# Altium PCB MD045B_PCB.PcbDoc (part 3 of 3)
Units mm, origin at the board's own origin, x right, y up, seen from the top; angles counter-clockwise.
Board outline 82.8 x 63.09 mm, 4 copper layers (Top Layer, Ground, Power, Bottom Layer), stack 1.707 mm thick; 146 components, 68 nets, 333 pads, 309 vias.
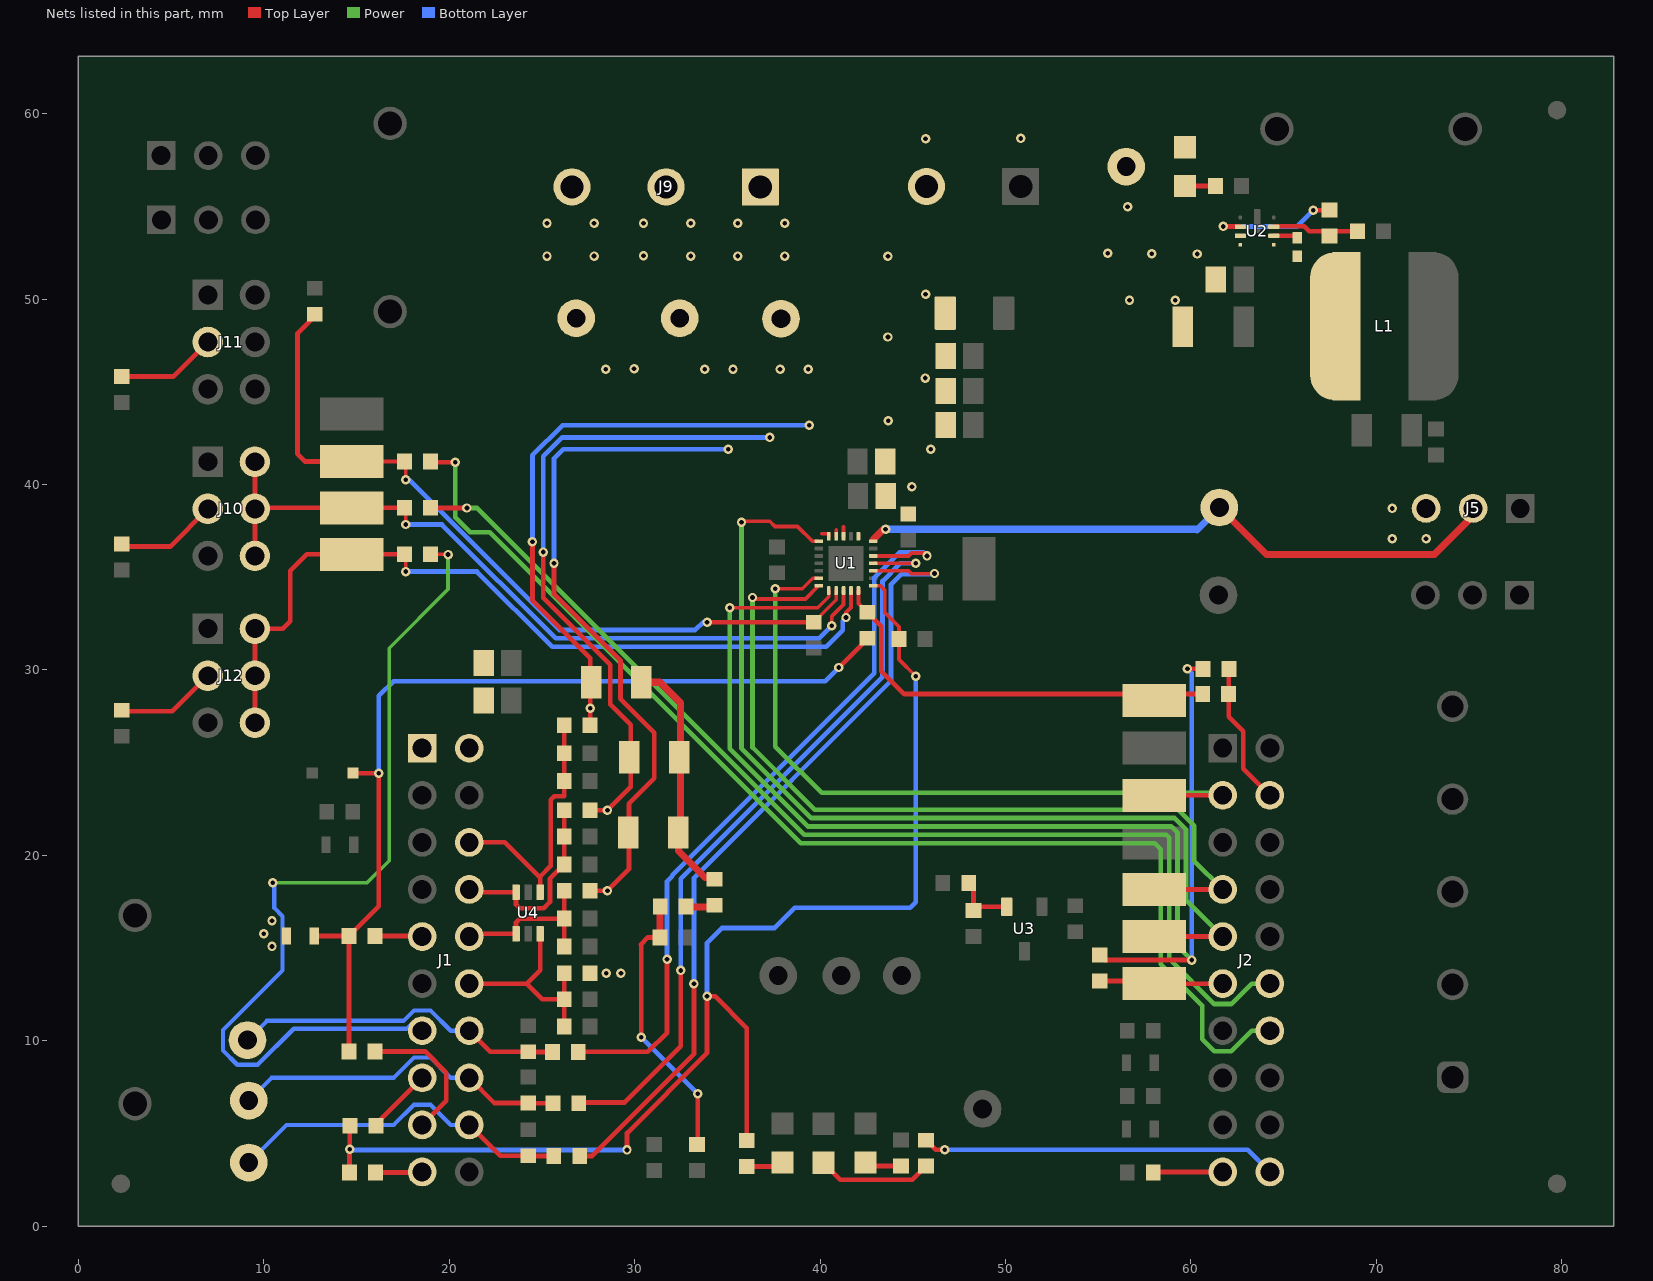
[diagram p4: the nets of this part, all layers, seen from the top]

## Via types
v1: diameter 0.508, hole 0.254, Top Layer to Bottom Layer, tented both sides, 303 vias
v2: diameter 0.5, hole 0.2, Top Layer to Bottom Layer, 5 vias
v3: diameter 0.508, hole 0.254, Top Layer to Bottom Layer, tented bottom, 1 vias

## Nets (pads, with @x,y where several pads share a name; then routed paths per layer and width w, separated by ;. In a path a pad name is that pad's centre, name@x,y a point inside that pad or via, vN(x,y) a via of type N, cw(c..) or ccw(c..) an arc to the next point about the centre after c; other vN are vias at no path point) (continued)
INHC: J2.9 TP14.1 U1.13 | length 52.9
  Top Layer w0.2: v1(35.763,37.973) 35.809,38.019 37.292,38.019 37.57,37.741 38.792,37.741 39.583,36.95 U1.13@39.937,36.95
  Top Layer w0.254: TP14.1@58.025,15.621 J2.9@61.722,15.621
  Power w0.254: v1(35.763,37.973) 35.763,25.773 39.522,22.014 59.125,22.014 59.74,21.398 59.74,17.603 J2.9@61.722,15.621
INLA: J2.3 TP13.1 U1.18 | length 40
  Top Layer w0.2: v1(37.592,34.385) 39.042,34.385 39.607,34.95 U1.18@39.937,34.95
  Top Layer w0.254: TP13.1@58.025,23.241 J2.3@61.722,23.241
  Power w0.254: v1(37.592,34.385) 37.592,25.871 40.087,23.376 61.587,23.376 J2.3@61.722,23.241
INLB/PWM_SYN: J2.7 TP7.1 U1.19 | length 45.3
  Top Layer w0.2: v1(36.36,33.909) 36.438,33.831 39.218,33.831 U1.19@39.937,34.55
  Top Layer w0.254: TP7.1@58.025,18.161 J2.7@61.722,18.161
  Power w0.254: v1(36.36,33.909) 36.36,25.819 39.711,22.468 59.313,22.468 60.194,21.586 60.194,19.689 J2.7@61.722,18.161
INLC: J2.11 R1.1 TP21.1 | length 6.7
  Top Layer w0.254: R1.1@55.093,13.219 57.887,13.219 TP21.1@58.025,13.081 J2.11@61.722,13.081
INLC/nSCS: R1.2 R41.2 U1.20 | length 68.4
  Top Layer w0.2: v1(35.137,33.355) 39.877,33.355 40.472,33.95 U1.20@40.472,34.285
  Top Layer w0.254: R1.2@55.093,14.619 55.361,14.351 v1(60.046,14.351) ; v1(59.817,30.062) 60.64,30.062 R41.2@60.653,30.048
  Power w0.254: v1(35.137,33.355) 35.137,25.758 39.334,21.56 58.937,21.56 59.286,21.21 59.286,15.11 v1(60.046,14.351)
  Bottom Layer w0.254: v1(59.817,30.062) 60.046,29.833 v1(60.046,14.351)
ISENA: C10.1 J1.14 R2.1 TP3.1 | length 18
  Top Layer w0.254: J1.14@21.082,10.541 22.214,9.409 C10.1@24.257,9.409 24.268,9.398 R2.1@25.564,9.398
  Bottom Layer w0.225: TP3.1@9.119,10.033 10.16,11.074 17.537,11.074 18.091,11.629 18.993,11.629 20.08,10.541 J1.14@21.082,10.541
ISENB: C11.1 J1.16 R3.1 TP10.1 | length 18.4
  Top Layer w0.254: J1.16@21.082,8.001 22.442,6.641 C11.1@24.257,6.641 24.268,6.629 R3.1@25.589,6.629
  Bottom Layer w0.225: TP10.1@9.19,6.773 10.418,8.001 17.004,8.001 18.091,9.089 18.993,9.089 20.08,8.001 J1.16@21.082,8.001
ISENC: C12.1 J1.18 R5.1 TP17.1 | length 18.9
  Top Layer w0.2: R5.1@25.522,3.794 R5.1@25.543,3.815
  Top Layer w0.254: J1.18@21.082,5.461 22.747,3.796 C12.1@24.257,3.796 24.268,3.785 R5.1@25.64,3.785
  Bottom Layer w0.225: TP17.1@9.19,3.429 11.222,5.461 17.004,5.461 18.091,6.549 18.993,6.549 20.08,5.461 J1.18@21.082,5.461
MCU_LED: J2.20 R34.1 | length 19.3
  Top Layer w0.254: R34.1@45.72,4.637 46.242,4.115 v1(46.736,4.115)
  Bottom Layer w0.254: v1(46.736,4.115) 63.068,4.115 J2.20@64.262,2.921
NetC1_1: C1.1 U2.6 | length 1.3
  Top Layer w0.254: U2.6@64.475,53.417 65.633,53.417 C1.1@65.735,53.315
NetC1_2: C1.2 L1.1 U2.5
NetC5_1: C5.1 R4.1 U2.7 | length 4.7
  Top Layer w0.254: U2.7@64.475,53.917 64.475,53.942 66.121,53.942 66.392,53.67 C5.1@68.998,53.67
NetD2_2: D2.2 R31.2 | length 2
  Top Layer w0.254: D2.2@42.451,3.43 42.643,3.239 R31.2@44.37,3.239
NetD3_2: D3.2 R32.2 | length 2
  Top Layer w0.254: R32.2@36.05,3.222 37.764,3.222 D3.2@37.973,3.431
NetD4_2: D4.2 R33.2 | length 1.7
  Top Layer w0.254: D4.2@59.69,56.1 R33.2@61.341,56.1
NetD5_2: D5.2 R34.2 | length 6.2
  Top Layer w0.254: D5.2@40.183,3.424 41.099,2.508 41.711,2.508 41.716,2.503 44.986,2.503 R34.2@45.72,3.237
NetJ1_1: J1.1 R14.2
NetJ1_2: J1.2 R15.1 | length 0.1
  Top Layer w0.254: J1.2@21.031,25.832 J1.2@21.082,25.781
NetJ1_9: J1.9 R17.2 | length 2.6
  Top Layer w0.254: R17.2@15.991,15.646 18.517,15.646 J1.9@18.542,15.621
NetJ1_15: J1.15 R18.2 | length 3.6
  Top Layer w0.254: R18.2@16.042,5.41 16.042,5.501 J1.15@18.542,8.001
NetJ1_17: J1.17 R19.2 | length 7.7
  Top Layer w0.254: R19.2@15.991,9.423 18.694,9.423 19.837,8.28 19.837,6.756 J1.17@18.542,5.461
NetJ1_19: J1.19 R20.2 | length 2.5
  Top Layer w0.254: R20.2@16.016,2.896 18.517,2.896 J1.19@18.542,2.921
NetJ2_19: J2.19 R21.2 | length 3.8
  Top Layer w0.254: R21.2@57.977,2.896 58.002,2.921 J2.19@61.722,2.921
NetJ10_3: J10.3 R38.2 | length 5.5
  Top Layer w0.254: R38.2@2.337,36.793 2.475,36.655 4.945,36.655 J10.3@6.98,38.69
NetJ11_3: J11.3 R39.2 | length 5.4
  Top Layer w0.254: R39.2@2.337,45.829 5.119,45.829 J11.3@6.98,47.69
NetJ12_3: J12.3 R40.2 | length 5.4
  Top Layer w0.254: R40.2@2.355,27.776 5.066,27.776 J12.3@6.98,29.69
NetR4_2: R4.2 U2.2 | length 7
  Top Layer w0.254: v1(61.747,53.924) 61.755,53.917 U2.2@62.675,53.917 ; v1(66.61,54.802) R4.2@67.488,54.802
  Bottom Layer w0.254: v1(61.747,53.924) 65.732,53.924 v1(66.61,54.802)
NetR43_2: R43.2 R44.2 R45.1 R47.2 | length 13
  Top Layer w0.381: R43.2@30.455,29.337 31.369,29.337 32.487,28.219 32.487,21.692 R47.2@32.196,21.401 ; R47.2@32.363,21.234 32.363,20.236 33.791,18.809 R45.1@34.315,18.809
NetR45_2: R45.2 R46.2 | length 1.6
  Top Layer w0.381: R46.2@32.78,17.247 32.818,17.209 R45.2@34.315,17.209
NetR46_1: R46.1 R48.1 R49.2 | length 14.8
  Top Layer w0.254: v1(30.353,10.185) 30.353,15.164 30.328,15.189 30.709,15.57 R49.2@31.366,15.57 ; R48.1@33.363,4.508 33.401,4.546 v1(33.401,7.137)
  Top Layer w0.381: R49.2@31.366,15.57 31.38,15.584 R46.1@31.38,17.247
  Bottom Layer w0.254: v1(30.353,10.185) v1(33.401,7.137)
nFAULT: R6.2 R18.1 R20.1 R32.1 U1.1 | length 70
  Top Layer w0.2: U1.1@42.867,34.55 43.25,34.55 43.485,34.315 43.485,33.107 44.258,32.334 R6.2@44.258,31.75 ; R6.2@44.258,31.674 44.258,30.57 v1(45.161,29.667)
  Top Layer w0.254: R20.1@14.642,2.921 R20.1@14.616,2.896 14.616,4.126 v1(14.63,4.14) 14.642,4.151 R18.1@14.642,5.41 ; v1(29.591,4.11) 29.591,5.022 33.909,9.34 v1(33.909,12.395) 34.341,12.395 36.05,10.686 R32.1@36.05,4.622 R32.1@35.873,4.445
  Bottom Layer w0.254: v1(14.63,4.14) 14.661,4.11 v1(29.591,4.11) ; v1(33.909,12.395) 33.909,15.291 34.696,16.078 37.541,16.078 38.633,17.17 39.192,17.17 39.195,17.174 44.86,17.174 45.161,17.475 v1(45.161,29.667)
nSCS: J2.4 R11.1 R41.1 | length 7.7
  Top Layer w0.254: R41.1@62.053,30.048 62.053,28.714 R11.1@62.041,28.702 62.041,27.474 62.824,26.691 62.824,24.679 J2.4@64.262,23.241
nSCS/nSLEEP: R11.2 R12.2 TP5.1 U1.24 | length 22.7
  Top Layer w0.2: U1.24@42.072,34.285 42.072,33.583 R12.2@42.545,33.11
  Top Layer w0.254: R12.2@42.545,33.11 43.307,32.348 43.307,29.933 44.538,28.702 R11.2@60.641,28.702
nSLEEP: D1.1 R12.1 R16.1 R17.1 R19.1 | length 50.8
  Top Layer w0.254: R16.1@12.721,15.646 R17.1@14.591,15.646 ; R19.1@14.591,9.423 R17.1@14.591,15.646 ; R17.1@14.605,15.646 R17.1@14.591,15.646 ; D1.1@14.808,24.435 v1(16.205,24.435) 16.205,17.261 R17.1@14.591,15.646 ; v1(41.013,30.132) 42.545,31.664 R12.1@42.545,31.71
  Bottom Layer w0.254: v1(16.205,24.435) 16.205,28.6 16.996,29.391 40.272,29.391 v1(41.013,30.132)
OUTA: J9.1 R24.2 R43.1 TP2.1 U1.10 | length 32
  Top Layer w0.2: U1.10@41.272,37.215 41.272,37.722
  Top Layer w0.254: v1(24.489,36.908) 24.489,33.753 27.602,30.64 v1(27.602,27.943) R24.2@27.602,27.013
  Bottom Layer w0.254: v1(24.489,36.908) 24.489,41.583 26.112,43.205 v1(39.421,43.205)
  other v1: 37.846,46.228 39.37,46.228 35.56,52.324 38.1,52.324 35.56,54.102 38.1,54.102
OUTB: J9.2 R25.2 R44.1 TP9.1 U1.11 | length 35.5
  Top Layer w0.2: U1.11@40.872,37.215 40.872,37.545
  Top Layer w0.254: v1(25.07,36.358) 25.07,33.884 28.681,30.273 28.681,28.139 29.784,27.036 29.784,23.69 v1(28.532,22.438) R25.2@27.602,22.438
  Bottom Layer w0.254: v1(25.07,36.358) 25.077,36.366 25.077,41.529 26.093,42.545 v1(37.292,42.545)
  other v1: 33.782,46.228 35.306,46.228 33.02,52.324 30.48,52.349 30.48,54.102 33.02,54.102
OUTC: J9.3 R26.2 R47.1 TP16.1 U1.12 | length 37.6
  Top Layer w0.2: 40.107,37.35 40.472,37.35 U1.12@40.472,37.215
  Top Layer w0.254: v1(25.651,35.753) 25.651,34.115 29.235,30.531 29.235,28.448 31.064,26.619 31.064,24.155 29.693,22.784 29.693,19.249 v1(28.532,18.088) R26.2@27.602,18.088
  Bottom Layer w0.254: v1(25.651,35.753) 25.651,36.599 25.65,41.402 26.158,41.91 v1(35.052,41.91)
  other v1: 28.448,46.228 29.972,46.253 25.273,52.324 27.813,52.324 25.273,54.102 27.813,54.102
SCLK: J1.13 R8.1 | length 48.4
  Top Layer w0.2: R8.1@18.988,36.241 19.922,36.241 v1(19.939,36.224)
  Power w0.2: v1(10.48,18.517) 15.57,18.517 16.764,19.71 16.764,31.177 19.939,34.352 v1(19.939,36.224)
  Bottom Layer w0.225: v1(10.48,18.517) 10.566,18.43 10.566,17.154 11.006,16.715 11.006,13.799 7.79,10.583 7.79,9.483 8.568,8.704 9.669,8.704 11.614,10.649 17.713,10.649 18.074,11.009 J1.13@18.542,10.541
SCLK/MODE: J12.2 J12.4 J12.6 R8.2 TP4.1 U1.23 | length 45.3
  Top Layer w0.2: R8.2@17.588,36.241 17.653,36.176 v1(17.653,35.306) ; v1(41.402,32.832) 41.402,33.102 41.672,33.371 41.672,33.955 ; 41.672,33.955 U1.23@41.672,34.285
  Top Layer w0.254: J12.6@9.52,27.15 J12.4@9.52,29.69 J12.2@9.52,32.23 11.021,32.23 11.43,32.639 11.43,35.352 12.319,36.241 TP4.1@14.732,36.241 R8.2@17.588,36.241
  Bottom Layer w0.254: v1(17.653,35.306) 21.494,35.306 25.551,31.249 40.326,31.249 41.221,32.144 41.221,32.651 v1(41.402,32.832)
SDI: J2.12 R9.1 | length 60.7
  Top Layer w0.254: R9.1@18.988,38.748 19.001,38.735 v1(20.955,38.735)
  Power w0.254: v1(20.955,38.735) 21.517,38.735 39.146,21.106 58.681,21.106 58.832,20.955 58.832,14.412 61.266,11.979 62.178,11.979 63.28,13.081 J2.12@64.262,13.081
SDI/SLEW: J10.2 J10.4 J10.6 R9.2 TP11.1 U1.22 | length 42.1
  Top Layer w0.2: R9.2@17.588,38.748 17.653,38.683 v1(17.653,37.846) ; v1(40.64,32.385) 40.64,32.905 41.272,33.537 U1.22@41.272,34.285
  Top Layer w0.254: J10.6@9.52,36.15 J10.4@9.52,38.69 ; J10.2@9.52,41.23 J10.4@9.52,38.69 ; R9.2@17.588,38.748 TP11.1@14.732,38.748 9.578,38.748 J10.4@9.52,38.69
  Bottom Layer w0.254: v1(17.653,37.846) 19.607,37.846 25.749,31.703 39.958,31.703 v1(40.64,32.385)
SDO: J2.14 R10.1 | length 65.5
  Top Layer w0.254: R10.1@18.988,41.25 19.029,41.209 v1(20.32,41.209)
  Power w0.254: v1(20.32,41.209) 20.32,38.227 21.122,37.425 22.185,37.425 38.958,20.652 58.046,20.652 58.378,20.32 58.378,14.139 60.62,11.897 60.62,10.085 61.266,9.439 62.178,9.439 63.28,10.541 J2.14@64.262,10.541 J2.14@64.262,10.414
SDO/GAIN: R10.2 R13.2 R42.1 TP18.1 U1.21 | length 42.5
  Top Layer w0.2: TP18.1@14.732,41.25 R10.2@17.588,41.25 17.653,41.185 v1(17.653,40.259) ; R13.2@39.665,32.577 40.872,33.784 U1.21@40.872,34.285
  Top Layer w0.254: R42.1@12.751,49.086 11.811,48.146 11.811,41.656 12.217,41.25 TP18.1@14.732,41.25 ; v1(33.909,32.577) R13.2@39.665,32.577
  Bottom Layer w0.254: v1(17.653,40.259) 17.836,40.259 25.938,32.157 33.274,32.157 33.694,32.577 v1(33.909,32.577)
SOA: R2.2 U1.5 | length 40.9
  Top Layer w0.2: U1.5@42.867,36.15 44.778,36.15 44.932,36.304 45.617,36.304 v1(45.771,36.15)
  Top Layer w0.254: R2.2@26.946,9.4 26.943,9.403 30.714,9.403 31.75,10.439 v1(31.75,14.402)
  Bottom Layer w0.254: v1(31.75,14.402) 31.75,18.593 32.033,18.875 32.033,18.933 42.919,29.82 42.919,34.983 44.267,36.331 45.59,36.331 v1(45.771,36.15)
SOB: R3.2 U1.4 | length 40.9
  Top Layer w0.2: U1.4@42.867,35.75 v1(45.161,35.75)
  Top Layer w0.254: R3.2@26.963,6.685 26.943,6.665 29.449,6.665 32.487,9.703 v1(32.487,13.792)
  Bottom Layer w0.254: v1(32.487,13.792) 32.487,18.745 43.373,29.632 43.373,34.795 44.328,35.75 v1(45.161,35.75)
SOC: R5.2 U1.3 | length 44.1
  Top Layer w0.2: U1.3@42.867,35.35 44.778,35.35 44.932,35.196 46.169,35.196 v1(46.177,35.204)
  Top Layer w0.254: R5.2@27.04,3.785 27.711,3.785 33.198,9.271 v1(33.198,13.081)
  Bottom Layer w0.254: v1(33.198,13.081) 33.198,18.776 43.827,29.406 43.827,34.607 44.389,35.169 46.142,35.169 v1(46.177,35.204)
VIN_AVDD: J5.2 TP8.1 U1.7 | length 35.4
  Top Layer w0.381: U1.7@42.875,37.04 43.427,37.592 v1(43.536,37.592) ; TP8.1@61.543,38.764 64.086,36.22 73.132,36.22 75.23,38.319 J5.2@75.23,38.713
  Bottom Layer w0.254: 60.293,37.592 60.332,37.553
  Bottom Layer w0.381: v1(43.536,37.592) 60.293,37.592 ; 60.332,37.553 TP8.1@61.543,38.764
VM: C3.1 C4.1 C6.2 C8.1 C9.1 C16.2 C17.1 C18.1 C19.1 D4.1 J3.2 J5.3 R16.2 R23.2 TP1.1 U1.8 U2.3 U2.4
  other v1: 28.473,13.642 29.261,13.642 10.439,15.088 9.99,15.773 10.439,16.48 70.866,37.084 72.69,37.084 70.866,38.713 44.958,39.877 45.972,41.91 43.684,43.437 45.669,45.745 43.663,47.96 56.693,49.936 59.157,49.936 45.695,50.267 43.663,52.315 60.35,52.436 57.887,52.451 55.524,52.476 56.591,54.991 45.695,58.649 50.825,58.673
VREF: C14.1 R22.2 U3.2 | length 3.5
  Top Layer w0.254: R22.2@48.024,18.504 48.274,18.254 C14.1@48.274,17.028 48.474,17.228 U3.2@50.074,17.228
VSENA: C21.2 J1.6 R24.1 R28.2 U4.1 | length 14.5
  Top Layer w0.254: J1.6@21.082,20.701 23.002,20.701 24.907,18.796 ; U4.1@24.907,18.016 24.907,18.796 ; R24.1@26.202,27.013 R28.2@26.202,25.513 C21.2@26.202,24.013 26.202,23.19 25.667,23.19 25.475,22.998 25.475,19.428 24.907,18.86 24.907,18.796
VSENB: C22.1 J1.8 R25.1 R29.2 U4.3 | length 10.6
  Top Layer w0.254: J1.8@21.082,18.161 21.227,18.016 U4.3@23.607,18.016 23.607,17.35 23.812,17.145 25.094,17.145 25.434,17.485 25.434,18.745 C22.1@26.202,19.513 R29.2@26.202,21.013 R25.1@26.202,22.438
VSENC: C23.1 J1.10 R26.1 R30.2 U4.4 | length 8.9
  Top Layer w0.254: J1.10@21.082,15.621 21.227,15.766 U4.4@23.607,15.766 23.607,16.383 23.812,16.588 R30.2@26.202,16.588 ; C23.1@26.202,15.088 R30.2@26.202,16.588 ; R26.1@26.202,18.088 R30.2@26.202,16.588
VSENVM: C20.1 J1.12 R23.1 R27.2 U4.6 | length 11.3
  Top Layer w0.254: J1.12@21.082,13.081 24.181,13.081 ; U4.6@24.907,15.766 24.907,13.807 24.181,13.081 ; C20.1@26.202,10.763 R27.2@26.202,12.242 ; R23.1@26.202,13.642 R27.2@26.202,12.242 ; 24.181,13.081 25.02,12.242 R27.2@26.202,12.242
pads on no net: FID1.1 FID2.1 FID3.1 J1.3 J1.5 J1.11 J2.6 J2.8 J2.10 J2.16 J2.17 J2.18 LBL1.0 SH-J5.0 SH-J6.0 SH-J7.0 SH-J8.0 SH-J10.0 SH-J11.0 SH-J12.0

## Polygon pours and split planes (outlines as drawn)
VM on Top Layer "TOP_LAYER_VM_P173" (solid, remove dead copper, pour order 173): 11.971,15.38 11.97,15.38 11.297,14.707 10.206,14.707 9.533,15.38 9.533,16.613 9.787,16.867 9.788,16.866 11.717,16.866 11.971,16.612
GND on Top Layer "TOP_LAYER_GND_P177" (solid, remove dead copper, pour order 177): -0.004,63.098 82.8,63.098 82.8,0.004 -0.004,0.004
VM on Top Layer "TOP_LAYER_VM_P176" (solid, remove dead copper, pour order 176): 26.924,13.919 27.229,14.224 29.718,14.224 29.972,13.97 29.972,13.208 29.718,12.954 27.178,12.954 26.924,13.208
VM on Top Layer "TOP_LAYER_VM_P174" (solid, remove dead copper, pour order 174): 70.256,37.084 70.764,36.576 72.896,36.576 74.066,37.742 74.066,39.624 73.711,39.98 70.866,39.98 70.256,39.37
3V3 on Top Layer "TOP_LAYER_3V3_P172" (solid, remove dead copper, pour order 172): 22.733,31.013 22.911,31.191 24.994,31.191 25.4,30.785 25.4,29.947 24.994,29.54 22.911,29.54 22.809,29.667 22.733,29.754
+5V on Top Layer "TOP_LAYER_+5V_P171" (solid, remove dead copper, pour order 171): 22.708,28.981 23.114,29.388 24.994,29.388 25.4,28.981 25.4,26.924 24.994,26.518 23.114,26.518 22.708,26.924
AVDD on Top Layer "TOP_LAYER_AVDD_P169" (solid, remove dead copper, pour order 169): 35.535,34.29 36.043,34.798 39.243,34.798 39.626,35.154 40.081,35.154 40.157,35.23 40.157,35.433 40.081,35.509 38.227,35.509 38.1,35.636 35.204,35.636 33.757,37.084 32.029,37.084 31.521,36.576 31.521,34.823 32.029,34.29
+5V on Top Layer "TOP_LAYER_+5V_P152" (solid, remove dead copper, pour order 152): 23.393,13.589 23.607,13.375 24.374,13.375 24.562,13.564 24.562,16.205 23.393,16.205
NetJ1_2 on Top Layer "TOP_LAYER_NETJ1_2_P151" (solid, remove dead copper, pour order 151): 20.295,24.74 22.149,24.74 22.403,24.994 22.403,29.286 20.218,29.286 20.041,29.108 20.041,24.994
NetJ1_1 on Top Layer "TOP_LAYER_NETJ1_1_P149" (solid, remove dead copper, pour order 149): 17.501,24.994 17.755,24.74 19.558,24.74 19.812,24.994 19.812,29.225 20.026,29.439 22.403,29.439 22.403,31.293 18.491,31.293 17.45,30.251
3V3_BK on Top Layer "TOP_LAYER_3V3_BK_P146" (solid, remove dead copper, pour order 146): 77.029,52.867 77.826,52.07 77.826,43.028 76.937,42.139 71.374,42.139 71.374,52.476 71.764,52.867
OUTC on Top Layer "TOP_LAYER_OUTC_P145" (solid, remove dead copper, pour order 145): 39.668,36.982 40.564,36.982 40.564,37.44 29.108,49.106 29.108,57.887 28.322,58.673 25.039,58.673 24.282,57.917 24.282,47.96
OUTB on Top Layer "TOP_LAYER_OUTB_P143" (solid, remove dead copper, pour order 143): 34.188,57.912 34.188,51.062 41.123,37.465 41.123,36.982 40.615,36.982 40.615,37.442 29.312,49.161 29.312,57.887 30.098,58.673 33.427,58.673
OUTA on Top Layer "TOP_LAYER_OUTA_P142" (solid, remove dead copper, pour order 142): 41.123,37.471 41.123,37.109 41.427,37.109 41.427,38.024 39.497,51.55 39.497,57.912 38.736,58.673 35.152,58.673 34.392,57.912 34.392,51.353
VM on Top Layer "TOP_LAYER_VM_P140" (solid, remove dead copper, pour order 140): 41.986,37.008 42.468,37.008 43.017,37.563 47.121,37.571 47.363,37.813 47.369,52.31 47.371,56.515 48.233,57.377 53.975,57.377 54.737,56.615 54.737,48.895 56.261,47.371 58.547,47.371 60.96,47.371 61.976,48.387 61.976,51.651 62.871,52.546 63.075,52.546 63.075,53.409 62.941,53.543 59.436,53.547 58.42,54.563 58.42,56.642 58.928,57.15 60.198,57.15 60.604,57.556 60.604,59.461 60.198,59.868 43.929,59.88 42.926,58.877 42.926,38.962 41.986,37.427
NetC1_2 on Top Layer "TOP_LAYER_NETC1_2_P139" (solid, remove dead copper, pour order 139): 64.04,52.866 64.04,52.546 65.405,51.181 65.405,44.643 65.623,44.425 69.283,44.425 69.469,44.61 69.469,52.476 69.079,52.867
VM on Power "POWER_VM_P165" (solid, remove dead copper, pour order 165): 42.853,38.823 43.526,38.151 45.089,38.151 47.371,40.432 47.371,56.515 48.233,57.377 53.975,57.377 54.737,56.615 54.737,48.895 56.261,47.371 60.969,47.371 61.991,48.393 61.976,48.408 61.976,51.942 63.075,53.042 63.075,53.409 62.937,53.547 59.436,53.547 58.42,54.563 58.42,56.642 58.928,57.15 60.198,57.15 60.604,57.556 60.604,58.572 59.893,59.284 59.893,60.223 60.503,60.833 76.2,60.833 77.792,59.241 77.792,44.247 74.312,40.767 70.098,40.767 68.758,39.426 68.758,36.576 69.621,35.712 77.544,35.712 81.026,39.195 81.026,61.29 79.527,62.789 2.083,62.789 0.178,60.884 0.178,15.61 1.717,14.072 14.06,14.072 16.6,11.532 30.864,11.532 32.055,12.722 32.055,16.309 31.059,17.305 8.872,17.305 4.816,21.361 4.826,21.372 4.826,58.649 6.782,60.604 22.751,60.604 24.199,59.157 41.84,59.157 42.932,58.064
OUTC on Power "POWER_OUTC_P164" (solid, remove dead copper, pour order 164): 28.842,44.706 33.41,44.706 29.108,49.106 29.108,57.887 28.322,58.673 25.039,58.673 24.282,57.917 24.282,47.96
OUTA on Power "POWER_OUTA_P162" (solid, remove dead copper, pour order 162): 37.313,45.39 37.647,44.706 40.474,44.703 39.497,51.55 39.497,57.912 38.736,58.673 35.152,58.673 34.392,57.912 34.392,51.353
OUTB on Power "POWER_OUTB_P163" (solid, remove dead copper, pour order 163): 34.188,57.912 34.188,51.062 37.433,44.706 34.29,44.706 33.604,44.706 29.312,49.161 29.312,57.887 30.098,58.673 33.427,58.673
GND on Power "POWER_GND_P179" (solid, remove dead copper, pour order 179): 0,63.094 82.804,63.094 82.804,0 0,0
AVDD on Power "POWER_AVDD_P170" (solid, remove dead copper, pour order 170): 33.757,34.29 34.265,34.798 34.265,36.576 33.757,37.084 28.448,37.084 20.574,44.958 14.732,44.958 14.63,44.958 11.303,48.285 11.303,58.09 10.439,58.953 6.528,58.953 4.953,57.379 4.953,21.361 6.502,19.812 13.462,19.812 13.97,20.32 13.97,20.828 13.462,21.336 9.144,21.336 8.357,22.123 8.357,31.501 12.7,35.844 12.7,41.961 13.106,42.367 19.863,42.367 27.94,34.29
3V3 on Power "POWER_3V3_P161" (solid, remove dead copper, pour order 161): 22.733,29.754 22.911,29.54 25.933,29.54 27.051,28.423 27.051,25.4 27.051,21.793 36.678,12.167 40.056,12.167 42.901,15.011 46.025,15.011 48.87,12.167 52.883,12.167 53.619,11.43 53.619,7.722 56.693,4.648 72.235,4.648 72.898,5.245 72.873,31.75 74.143,33.02 74.143,34.417 73.304,35.255 70.764,35.255 70.028,35.992 70.028,39.37 70.866,40.234 73.711,40.234 74.066,40.589 74.066,41.656 73.711,41.961 62.128,41.961 60.96,40.792 60.96,34.214 52.934,26.187 46.203,26.187 44.229,28.161 44.229,30.861 38.506,30.861 38.506,25.984 40.386,24.105 62.662,24.105 62.662,20.041 38.989,20.041 27.838,31.191 22.911,31.191 22.733,31.013
+5V on Power "POWER_+5V_P156" (solid, remove dead copper, pour order 156): 47.996,10.008 56.276,1.727 77.241,1.727 78.943,3.429 78.943,41.656 78.638,41.961 76.733,41.961 76.429,41.656 76.429,5.105 75.819,4.496 56.54,4.496 53.391,7.645 53.391,11.343 52.756,11.978 48.702,11.978 46.025,14.656 45.923,14.757 42.901,14.757 40.122,11.978 36.652,11.978 26.949,21.768 26.949,28.448 26.01,29.388 23.114,29.388 22.708,28.981 22.708,14.275 23.597,13.386 24.638,13.386 25.654,14.402 29.693,14.402 34.087,10.008
GND on Ground "GROUND_GND_P178" (solid, remove dead copper, pour order 178): 0,63.094 82.804,63.094 82.804,0 0,0
OUTC on Bottom Layer "BOTTOM_LAYER_OUTC_P168" (solid, remove dead copper, pour order 168): 28.842,44.706 33.41,44.706 29.108,49.106 29.108,57.887 28.322,58.673 25.039,58.673 24.282,57.917 24.282,47.96
OUTA on Bottom Layer "BOTTOM_LAYER_OUTA_P166" (solid, remove dead copper, pour order 166): 37.313,45.39 37.647,44.706 40.474,44.703 39.497,51.55 39.497,57.912 38.736,58.673 35.152,58.673 34.392,57.912 34.392,51.353
OUTB on Bottom Layer "BOTTOM_LAYER_OUTB_P167" (solid, remove dead copper, pour order 167): 34.188,57.912 34.188,51.062 37.433,44.706 34.29,44.706 33.604,44.706 29.312,49.161 29.312,57.887 30.098,58.673 33.427,58.673
GND on Bottom Layer "BOTTOM_LAYER_GND_P180" (solid, remove dead copper, pour order 180): 0,63.094 82.804,63.094 82.804,0 0,0

## Keep-outs
Keep-Out Layer:
  text ".Layer_Name" at 14.656,-21.806 h1.52

## Other copper
Top Layer:
  text ".Layer_Name" at 14.656,-21.806 h1.52
Bottom Layer:
  text ".Layer_Name" at 14.656,-21.806 h1.52

## Silkscreen, mask and mechanical layers (free items; w line width, h text height)
Top Overlay:
  rectangle: 54.788,54.915 60.706,55.347
  rectangle: 45.444,25.349 49.425,26.897
  lines w0.127: 63.805,33.757 66.269,33.757 ; 63.805,38.557 66.294,38.557 66.294,37.084 ; 66.294,32.283 66.294,33.757 ; 67.793,32.283 67.793,33.757 70.358,33.757 ; 67.793,37.084 67.793,38.557 70.358,38.557 ; 63.805,32.283 63.805,34.315 63.805,35.585 70.358,35.585 70.358,32.283 63.805,32.283 ; 63.805,37.084 70.358,37.084 70.358,40.386 63.805,40.386 63.805,39.116 63.805,37.084
  lines w0.178: 5.71,43.88 0.787,43.873 0.762,51.5 5.71,51.5 ; 5.735,34.877 0.813,34.871 0.787,42.497 5.735,42.497 ; 5.761,25.883 0.838,25.876 0.813,33.503 5.761,33.503
  lines w0.203: 1.524,56.032 15.596,56.032 ; 1.524,59.334 1.524,52.832 15.596,52.832 15.596,59.36 1.524,59.36 ; 11.379,52.832 11.379,59.36 ; 11.379,54.483 12.903,54.483 12.903,52.832 ; 11.379,57.683 12.903,57.683 12.903,56.032 ; 14.072,52.832 14.072,54.483 15.596,54.483 ; 14.072,56.032 14.072,57.683 15.596,57.683 ; 56.058,11.938 56.032,37.922 59.436,37.922 59.436,31.267 60.02,31.267 60.02,11.938 ; 59.69,36.271 80.543,36.271 ; 59.69,41.021 59.69,36.424 59.69,31.648 80.543,31.648 80.543,36.424 ; 59.715,41.021 80.543,41.021 80.543,36.398 ; 35.052,0.635 35.052,10.516 46.736,10.516 46.736,0.635 35.052,0.635 ; 35.909,30.439 35.909,42.113 46.99,42.113 46.99,30.439 35.909,30.439
  lines w0.254: 54.864,54.966 60.604,54.966 60.604,60.706 54.864,60.706 54.864,54.966
  text "OUTC" at 24.79,61.341 h1.02
  text "OUTB" at 29.947,61.341 h1.02
  text "OUTA" at 35.103,61.316 h1.02
  text "VM" at 44.806,61.316 h1.02
  text "GND" at 49.505,61.316 h1.02
  text "AD0" at 12.471,58.09 h0.76
  text "." at 13.411,56.82 h1.02
  text "1" at 14.681,56.54 h0.76
  text "0" at 11.887,56.515 h0.76
  text "AD1" at 12.471,54.889 h0.76
  text "." at 13.386,53.619 h1.02
  text "1" at 14.681,53.34 h0.76
  text "0" at 11.887,53.315 h0.76
  text "AVDD" at 5.232,49.278 h0.51 r90
  text "OUTA" at 34.011,47.65 h0.64
  text "OUTC" at 22.911,47.625 h0.64
  text "OUTB" at 28.473,47.625 h0.64
  text "GAIN" at 2.515,47.135 h1.02 r90
  text "47k" at 5.232,46.939 h0.51 r90
  text "GND" at 5.232,44.323 h0.51 r90
  text "AVDD" at 5.283,40.361 h0.51 r90
  text "SLEW" at 2.515,38.151 h1.02 r90
  text "47k" at 5.283,38.024 h0.51 r90
  text "." at 66.98,37.795 h1.02
  text "VM" at 64.491,37.516 h0.64
  text "5V" at 68.58,37.516 h0.64
  text "GND" at 5.359,35.43 h0.51 r90
  text "." at 66.954,33.02 h1.02
  text "3V3" at 64.186,32.741 h0.64
  text "5V" at 68.58,32.741 h0.64
  text "AVDD" at 5.359,31.267 h0.51 r90
  text "MODE" at 2.515,28.981 h1.02 r90
  text "DRV8311H/S/P" at 35.56,28.981 h1.02
  text "47k" at 5.41,28.932 h0.51 r90
  text "GND" at 5.41,26.314 h0.51 r90
  text "HALL_PWR" at 81.839,26.086 h0.76 r90
  text "'.PRJ_Number'.PCB_Rev-" at 35.303,25.502 h1.27
  text "HALLA" at 81.966,21.156 h0.76 r90
  text "HALLB" at 81.966,16.185 h0.76 r90
  text "HALLC" at 81.966,10.978 h0.76 r90
  text "GND" at 81.966,6.604 h0.76 r90
  text "nFAULT" at 38.278,6.426 h0.64 r90
  text "MCU" at 40.538,6.426 h0.64 r90
  text "3V3" at 42.748,6.426 h0.64 r90
  text ".Layer_Name" at 14.656,-21.806 h1.52
Bottom Overlay:
  text ".Layer_Name" at 14.656,-21.806 h1.52
Top Paste:
  text ".Layer_Name" at 14.656,-21.806 h1.52
Bottom Paste:
  text ".Layer_Name" at 14.656,-21.806 h1.52
Top Solder:
  text ".Layer_Name" at 14.656,-21.806 h1.52
  text ".Layer_Name" at 14.656,-21.806 h1.52
Bottom Solder:
  text ".Layer_Name" at 14.656,-21.806 h1.52
Drill Guide:
  text ".Layer_Name" at 14.656,-21.806 h1.52
M1 Board Outline:
  the board outline again, w0.254
  text ".Layer_Name" at 14.656,-21.806 h1.52
M2 Board Dimensions:
  rectangle: 0,-6.985 3.175,-3.81
  rectangle: 3.175,-10.16 12.7,-6.985
  lines w0.178: 0,-6.985 25.4,-6.985 ; 3.175,-10.16 3.175,-3.81 ; 6.35,-10.16 6.35,-3.81 ; 12.7,-10.16 12.7,-3.81 ; 19.05,-10.16 19.05,-3.81 ; 0,-10.16 25.4,-10.16 25.4,-3.81 0,-3.81 0,-10.16
  text ".Layer_Name" at 14.656,-21.806 h1.52
M3 3D STEP Top:
  text ".Layer_Name" at 14.656,-21.806 h1.52
M4 3D STEP Bottom:
  text ".Layer_Name" at 14.656,-21.806 h1.52
M5 Assembly Top:
  lines w0.254: -7.417,-23.626 160.223,-23.626 ; -7.417,-18.462 160.274,-18.462 ; -7.417,-13.297 -7.417,-28.791 94.31,-28.791 160.274,-28.791 160.274,-13.297 -7.404,-13.297 -7.404,-28.791 32.614,-28.791 ; 55.194,-28.791 55.194,-13.297 ; 87.376,-18.462 87.376,-13.297 ; 108.712,-18.462 108.712,-13.297 ; 124.511,-28.956 124.511,-23.804
  text "COMPONENTS MARKED 'DNP' SHOULD NOT BE POPULATED." at 29.299,-8.09 h1.52
  text "ASSEMBLY VARIANT:" at 29.286,-11.024 h1.52
  text ".VariantName" at 55.601,-11.024 h1.52
  text "PCB VIEWED FROM TOP SIDE" at -5.804,-16.654 h1.52
  text "BOARD #:" at 57.099,-16.654 h1.52
  text ".PRJ_Number" at 70.955,-16.654 h1.52
  text "REV:" at 92.405,-16.654 h1.52
  text ".PCB_Rev" at 99.809,-16.654 h1.52
  text "SVN REV:" at 113.69,-16.654 h1.52
  text ".VersionControl_RevNumber" at 126.543,-16.654 h1.52
  text "TID #:" at 57.099,-21.819 h1.52
  text ".TID" at 70.955,-21.819 h1.52
  text "PLOT NAME =" at -5.804,-27.034 h1.52
  text ".plot_File_Name" at 14.656,-27.034 h1.52
  text "GENERATED    :" at 57.15,-27.034 h1.52
  text ".Print_Date" at 79.235,-27.034 h1.52
  text ".Print_Time" at 97.752,-27.034 h1.52
  text "TEXAS INSTRUMENTS" at 129.87,-27.034 h1.52
M6 Assembly Bottom:
  lines w0.254: -7.429,-18.474 160.261,-18.474 ; -7.379,-23.639 160.261,-23.639 ; 28.334,-28.969 28.334,-23.817 ; 44.133,-18.474 44.133,-13.31 ; 65.468,-18.474 65.468,-13.31 ; 97.65,-28.804 97.65,-13.31 ; 120.231,-28.804 160.249,-28.804 160.249,-13.31 -7.429,-13.31 -7.429,-28.804 58.534,-28.804 160.261,-28.804 160.261,-13.31
  text "COMPONENTS MARKED 'DNP' SHOULD NOT BE POPULATED." at 154.991,-8.077 h1.52
  text ".VariantName" at 128.473,-11.024 h1.52
  text "ASSEMBLY VARIANT:" at 154.864,-11.024 h1.52
  text ".VersionControl_RevNumber" at 26.302,-16.667 h1.52
  text "SVN REV:" at 39.154,-16.667 h1.52
  text ".PCB_Rev" at 53.035,-16.667 h1.52
  text "REV:" at 60.439,-16.667 h1.52
  text ".PRJ_Number" at 81.89,-16.667 h1.52
  text "BOARD #:" at 95.745,-16.667 h1.52
  text "PCB VIEWED FROM BOTTOM SIDE" at 158.648,-16.667 h1.52
  text ".TID" at 81.89,-21.831 h1.52
  text "TID #:" at 95.745,-21.831 h1.52
  text "TEXAS INSTRUMENTS" at 22.974,-27.047 h1.52
  text ".Print_Time" at 55.093,-27.047 h1.52
  text ".Print_Date" at 73.609,-27.047 h1.52
  text "GENERATED    :" at 95.694,-27.047 h1.52
  text ".plot_File_Name" at 138.189,-27.047 h1.52
  text "PLOT NAME =" at 158.648,-27.047 h1.52
M9 Title Sheet:
  drawing of 57 lines, arcs and shapes, not listed
  text "1" at 18.792,204.127 h1.78
  text "2" at 82.182,204.127 h1.78
  text "3" at 145.411,204.127 h1.78
  text "4" at 209.08,204.127 h1.78
  text "5" at 272.555,204.127 h1.78
  text "6" at 336.182,204.127 h1.78
  text "A" at -10.579,175.095 h1.78
  text "A" at 365.341,175.095 h1.78
  text "B" at -10.579,114.643 h1.78
  text "B" at 365.341,114.643 h1.78
  text "C" at -10.579,54.318 h1.78
  text "C" at 365.341,54.318 h1.78
  text "PROJECT TITLE:" at 288.125,7.048 h1.14
  text ".PRJ_Title" at 289.395,3.662 h1.78
  text "DESIGNED FOR:" at 288.125,-0.597 h1.14
  text ".PRJ_Customer" at 289.395,-4.153 h1.78
  text "D" at -10.579,-5.88 h1.78
  text "D" at 365.341,-5.88 h1.78
  text "FILE NAME:" at 288.125,-8.217 h1.14
  text ".PCB_File_Name_No_Path" at 289.395,-11.265 h1.78
  text "Texas Instruments (TI) and/or its licensors do not warrant the accuracy or completeness of this specification" at 161.9,-15.376 h1.14
  text "ENGINEER:" at 288.125,-15.583 h1.14
  text "LAYOUT BY:" at 326.352,-15.583 h1.14
  text "or any information contained therein. TI and/or its licensors do not warrant that this design will meet" at 160.757,-18.237 h1.14
  text ".PRJ_Engineer" at 289.395,-19.52 h1.78
  text ".PCB_Layout" at 327.635,-19.52 h1.78
  text "the specifications, will be suitable for your application or fit for any particular purpose, or will operate in" at 160.757,-21.099 h1.14
  text ".Layer_Name" at 14.656,-21.806 h1.52
  text "ALTIUM DESIGNER VERSION:" at 326.352,-23.457 h1.14
  text "an implementation. TI and/or its licensors do not warrant that the design is production worthy. You should" at 160.757,-23.961 h1.14
  text "completely validate and test your design implementation to confirm the system functionality for your application." at 161.9,-26.822 h1.14
  text ".print_Scale" at 289.395,-26.843 h1.78
  text ".Application_BuildNumber" at 327.635,-26.843 h1.78
  text "1" at 18.792,-32.093 h1.78
  text "2" at 82.182,-32.093 h1.78
  text "3" at 145.411,-32.093 h1.78
  text "4" at 209.08,-32.093 h1.78
  text "5" at 272.555,-32.093 h1.78
  text "6" at 336.182,-32.093 h1.78
M10 Fab Notes:
  drawing of 189 lines, arcs and shapes, not listed
  text "DESIGN INFORMATION" at 314.503,161.447 h1.52
  text "MIN. TRACK WIDTH:" at 298.131,158.091 h1.52
  text "8" at 325.976,158.091 h1.52
  text "MIL" at 329.907,158.091 h1.52
  text "MIN. CLEARANCE:" at 298.131,154.938 h1.52
  text "0.2" at 324.452,154.938 h1.52
  text "mm" at 329.907,154.938 h1.52
  text "MIN. VIA PAD SIZE:" at 298.131,151.785 h1.52
  text "24" at 325.214,151.785 h1.52
  text "MIL" at 329.907,151.785 h1.52
  text "0.05mm (2MIL)" at 315.784,148.486 h1.52
  text "MINIMUM ANNULAR RING" at 289.769,148.277 h1.52
  text "EXTERNAL" at 333.768,148.277 h1.52
  text "PER" at 294.849,145.48 h1.52
  text "IPC-D-275 CLASS 2 LEVEL C" at 300.437,145.48 h1.52
  text "MIL, HOLES" at 338.238,142.928 h1.52
  text "+/-" at 328.27,142.709 h1.52
  text "+/-" at 349.961,142.709 h1.52
  text "REGISTRATION TOLERANCES:" at 289.769,142.682 h1.52
  text "METAL" at 320.243,142.682 h1.52
  text "5" at 334.879,142.683 h1.52
  text "3" at 356.037,142.683 h1.52
  text "MIL" at 358.99,142.682 h1.52
  text "HOLE SIZE TOLERANCE (UNLESS OTHERWISE SPECIFIED):" at 289.769,140.185 h1.52
  text "+/-" at 349.961,140.112 h1.52
  text "3" at 356.037,140.085 h1.52
  text "MIL" at 358.99,140.085 h1.52
  text "MATERIAL:" at 287.87,136.589 h1.52
  text "FR-4 High Tg" at 312.926,133.324 h1.52
  text "X" at 309.257,133.122 h1.52
  text "FR-408" at 298.563,133.007 h1.52
  text "OTHER" at 336.358,133.007 h1.52
  text "62 MIL (1.6mm) +/-10%" at 306.694,129.374 h1.52
  text "X" at 303.643,129.312 h1.52
  text "THICKNESS:" at 289.769,129.165 h1.52
  text "OTHER" at 339.33,129.165 h1.52
  text "TOLERANCE:" at 289.769,125.652 h1.52
  text "X" at 311.314,125.652 h1.52
  text "ANSI IPC-6012 TYPE 3 CLASS 2" at 315.836,125.652 h1.52
  text "OTHER +/-" at 315.835,121.989 h1.52
  text "BOW & TWIST:" at 289.769,118.302 h1.52
  text "X" at 311.314,118.302 h1.52
  text "ANSI IPC-6012 TYPE 3 CLASS 2" at 315.836,118.302 h1.52
  text "OTHER +/-" at 315.835,114.576 h1.52
  text "DRILLING:" at 287.87,111.258 h1.52
  text "NC_DRILL FILES" at 332.599,108.586 h1.52
  text "REFERENCE:" at 289.769,108.486 h1.52
  text "X" at 306.463,108.484 h1.52
  text "AS SHOWN" at 310.984,108.486 h1.52
  text "X" at 329.348,108.486 h1.52
  text "OTHER" at 340.168,104.873 h1.52
  text "PTH COPPER THICKNESS:" at 289.761,104.783 h1.52
  text "X" at 318.697,104.783 h1.52
  text "20-30 um" at 321.948,104.783 h1.52
  text "BOARD FINISH:" at 287.87,101.034 h1.52
  text "SILKSCREEN:" at 291.812,98.237 h1.52
  text "X" at 316.14,98.237 h1.52
  text "TOP" at 319.112,98.237 h1.52
  text "X" at 329.094,98.237 h1.52
  text "BOTTOM" at 332.091,98.237 h1.52
  text "SILKSCREEN COLOR:" at 291.812,94.295 h1.52
  text "X" at 316.115,94.295 h1.52
  text "WHITE" at 319.112,94.295 h1.52
  text "OTHER" at 332.091,94.295 h1.52
  text "BLUE" at 347.534,90.829 h1.52
  text "X" at 334.442,90.678 h1.52
  text "GREEN" at 322.439,90.652 h1.52
  text "OTHER" at 338.136,90.652 h1.52
  text "SOLDER RESIST COLOR:" at 291.812,90.477 h1.52
  text "X" at 319.442,86.734 h1.52
  text "MATTE" at 322.439,86.734 h1.52
  text "SEMI-GLOSS" at 338.125,86.717 h1.52
  text "IMMERSION GOLD (ENIG)" at 314.819,82.345 h1.52
  text "ENEPIG" at 348.793,82.162 h1.52
  text "SURFACE FINISH:" at 287.87,82.136 h1.52
  text "X" at 310.298,82.136 h1.52
  text "IMM. TIN/SILVER OR EQUIV" at 296.24,78.649 h1.52
  text "OTHER" at 332.599,78.549 h1.52
  text "ARRAY/PANEL:" at 287.87,74.602 h1.52
  text "CUT AND TRIM PER M1 BOARD OUTLINE" at 314.819,74.393 h1.52
  text "N.C. ROUTE" at 314.819,70.94 h1.52
  text "X" at 332.295,70.94 h1.52
  text "V. SCORE" at 336.816,70.94 h1.52
  text "CERTIFICATION:" at 287.87,67.66 h1.52
  text "MATERIALS AND WORKMANSHIP FOR ALL PCBS" at 306.285,67.66 h1.52
  text "TO MEET OR EXCEED THE REQUIREMENTS OF:" at 306.285,65.271 h1.52
  text "X" at 297.078,62.003 h1.52
  text "ANSI IPC-A-600F CLASS ->" at 300.329,62.003 h1.52
  text "X" at 342.188,62.003 h1.52
  text "2" at 344.982,62.003 h1.52
  text "1" at 336.981,61.965 h1.52
  text "3" at 353.973,61.965 h1.52
  text "X" at 317.702,58.252 h1.52
  text "RoHS" at 320.953,58.252 h1.52
  text "OTHER" at 337.321,58.252 h1.52
  text "PER ORDER" at 347.407,58.252 h1.52
  text "ALL BOARDS MUST MEET OR EXCEED UL94-V0 REQUIREMENTS." at 288.569,54.345 h1.52
  text "PCB MUST BEAR THE UL94V-0 UL REGISTERED MATERIAL ID NUMBER" at 288.569,51.397 h1.52
  text "ADDITIONAL REQUIREMENTS:" at 287.87,47.094 h1.52
  text "MICROSECTION:" at 289.769,44.373 h1.52
  text "YES" at 312.775,44.373 h1.52
  text "REQUIRED" at 334.657,40.707 h1.52
  text "BARE BOARD ELEC. TEST:" at 289.769,40.634 h1.52
  text "NONE" at 322.935,40.634 h1.52
  text "X" at 331.66,40.634 h1.52
  text "PER ORDER" at 349.693,40.634 h1.52
  text "XX MIL VIAS REQUIRE NON-CONDUCTIVE FILL AND PLANARIZE" at 294.04,35.428 h1.5
  text "XX MIL VIAS REQUIRE CONDUCTIVE FILL AND PLANARIZE" at 294.243,32.787 h1.52
  text "OUTER XX MIL TRACES REQUIRE 50 OHM SINGLE-ENDED IMPEDANCE" at 294.218,28.637 h1.47
  text "LAYER 2 & 3 (INNER LAYERS) XX MIL WIDE, XX MIL SPACE / TRACES REQUIRE 100 OHM DIFFERENTIAL IMPEDANCE" at 294.015,22.65 h1.52
  text ".Layer_Name" at 14.656,-21.806 h1.52
M11 Gerber Information:
  lines w0.254: -7.417,-23.626 160.223,-23.626 ; -7.417,-18.462 160.274,-18.462 ; -7.417,-13.297 -7.417,-28.791 94.31,-28.791 160.274,-28.791 160.274,-13.297 -7.404,-13.297 -7.404,-28.791 32.614,-28.791 ; 55.194,-28.791 55.194,-13.297 ; 87.376,-18.462 87.376,-13.297 ; 108.712,-18.462 108.712,-13.297 ; 124.511,-28.956 124.511,-23.804
  text "ALL ARTWORK VIEWED FROM TOP SIDE" at -5.804,-16.654 h1.52
  text "BOARD #:" at 57.099,-16.654 h1.52
  text ".PRJ_Number" at 70.955,-16.654 h1.52
  text "REV:" at 92.405,-16.654 h1.52
  text ".PCB_Rev" at 99.809,-16.654 h1.52
  text "SVN REV:" at 113.69,-16.654 h1.52
  text ".VersionControl_RevNumber" at 126.543,-16.654 h1.52
  text "LAYER NAME =" at -5.804,-21.806 h1.52
  text "TID #:" at 57.099,-21.819 h1.52
  text ".TID" at 70.955,-21.819 h1.52
  text "PLOT NAME =" at -5.804,-27.034 h1.52
  text ".plot_File_Name" at 14.656,-27.034 h1.52
  text "GENERATED    :" at 57.15,-27.034 h1.52
  text ".Print_Date" at 79.235,-27.034 h1.52
  text ".Print_Time" at 97.752,-27.034 h1.52
  text "TEXAS INSTRUMENTS" at 129.87,-27.034 h1.52
M12 Stackup:
  drawing of 295 lines, arcs and shapes, not listed
  text "Layer" at 249.03,191.935 h1.52
  text "Name" at 259.442,191.935 h1.52
  text "Material" at 283.058,191.935 h1.52
  text "Thickness" at 304.896,191.935 h1.52
  text "Constant" at 321.401,191.935 h1.52
  text "Board Layer Stack" at 335.876,191.935 h1.52
  text "1" at 249.03,188.887 h1.52
  text "Top Overlay" at 259.442,188.887 h1.52
  text "2" at 249.03,185.839 h1.52
  text "Top Solder" at 259.442,185.839 h1.52
  text "Solder Resist" at 283.058,185.839 h1.52
  text "0.40mil" at 304.896,185.839 h1.52
  text "3.5" at 321.401,185.839 h1.52
  text "3" at 249.03,182.791 h1.52
  text "Top Layer" at 259.442,182.791 h1.52
  text "Copper" at 283.058,182.791 h1.52
  text "4.20mil" at 304.896,182.791 h1.52
  text "4" at 249.03,179.743 h1.52
  text "Dielectric1" at 259.442,179.743 h1.52
  text "FR-4" at 283.058,179.743 h1.52
  text "8.00mil" at 304.896,179.743 h1.52
  text "4.2" at 321.401,179.743 h1.52
  text "5" at 249.03,176.695 h1.52
  text "Ground" at 259.442,176.695 h1.52
  text "Copper" at 283.058,176.695 h1.52
  text "1.40mil" at 304.896,176.695 h1.52
  text "6" at 249.03,173.647 h1.52
  text "Dielectric 2" at 259.442,173.647 h1.52
  text "FR-4" at 283.058,173.647 h1.52
  text "40.00mil" at 304.896,173.647 h1.52
  text "4.2" at 321.401,173.647 h1.52
  text "7" at 249.03,170.599 h1.52
  text "Power" at 259.442,170.599 h1.52
  text "Copper" at 283.058,170.599 h1.52
  text "1.40mil" at 304.896,170.599 h1.52
  text "8" at 249.03,167.551 h1.52
  text "Dielectric 3" at 259.442,167.551 h1.52
  text "FR-4" at 283.058,167.551 h1.52
  text "8.00mil" at 304.896,167.551 h1.52
  text "4.2" at 321.401,167.551 h1.52
  text "9" at 249.03,164.503 h1.52
  text "Bottom Layer" at 259.442,164.503 h1.52
  text "Copper" at 283.058,164.503 h1.52
  text "4.20mil" at 304.896,164.503 h1.52
  text "10" at 249.03,161.455 h1.52
  text "Bottom Solder" at 259.442,161.455 h1.52
  text "Solder Resist" at 283.058,161.455 h1.52
  text "0.40mil" at 304.896,161.455 h1.52
  text "3.5" at 321.401,161.455 h1.52
  text "11" at 249.03,158.407 h1.52
  text "Bottom Overlay" at 259.442,158.407 h1.52
  text ".Layer_Name" at 14.656,-21.806 h1.52
M13 Component Bodies Top:
  text ".Layer_Name" at 14.656,-21.806 h1.52
M14 Component Bodies Bottom:
  text ".Layer_Name" at 14.656,-21.806 h1.52
M15 Courtyards Top:
  text ".Layer_Name" at 14.656,-21.806 h1.52
M16 Courtyards Bottom:
  text ".Layer_Name" at 14.656,-21.806 h1.52
Drill Drawing:
  circle w0.254: c136.238,84.683 r0.702
  lines w0.254: 135.537,68.543 135.888,68.543 136.238,68.192 136.589,68.543 136.94,68.543 136.589,68.894 136.94,69.245 136.589,69.245 136.238,69.596 135.888,69.245 135.537,69.245 135.888,68.894 135.537,68.543 ; 135.537,72.753 136.94,72.753 136.238,71.35 135.537,72.753 ; 135.537,74.859 135.888,74.859 135.888,74.508 136.589,74.508 136.589,74.859 136.94,74.859 136.94,75.56 136.589,75.56 136.589,75.911 135.888,75.911 135.888,75.56 135.537,75.56 135.537,74.859 ; 135.537,77.665 136.94,77.665 136.94,79.069 135.537,79.069 135.537,77.665 ; 135.537,80.823 136.238,81.174 136.94,80.823 136.589,81.525 136.94,82.227 136.238,81.876 135.537,82.227 135.888,81.525 135.537,80.823 ; 135.537,87.139 135.537,87.49 135.888,87.84 135.537,88.191 135.537,88.542 135.888,88.542 136.238,88.191 136.589,88.542 136.94,88.542 136.94,88.191 136.589,87.84 136.94,87.49 136.94,87.139 136.589,87.139 136.238,87.49 135.888,87.139 135.537,87.139
  lines w0.305: 134.264,67.245 216.344,67.245 ; 134.264,89.349 216.344,89.349 ; 142.846,64.087 142.846,92.507 ; 151.279,64.087 151.279,92.507 ; 167.448,64.087 167.448,92.507 ; 174.03,64.087 174.03,92.507 ; 183.559,64.087 183.559,92.507 ; 201.957,64.087 201.957,92.507 ; 134.264,64.087 216.344,64.087 216.344,92.507 134.264,92.507 134.264,64.087
  text "Symbol" at 136.159,90.296 h1.83
  text "Quantity" at 143.793,90.296 h1.83
  text "Finished Hole Size" at 152.226,90.296 h1.83
  text "Plated" at 168.395,90.296 h1.83
  text "Hole Type" at 174.977,90.296 h1.83
  text "Drill Layer Pair" at 184.506,90.296 h1.83
  text "Hole Tolerance" at 202.904,90.296 h1.83
  text "5" at 143.793,87.139 h1.52
  text "7.87mil (0.200mm)" at 152.226,87.139 h1.52
  text "PTH" at 168.395,87.139 h1.52
  text "Round" at 174.977,87.139 h1.52
  text "Top Layer - Bottom Layer" at 184.506,87.139 h1.52
  text "304" at 143.793,83.981 h1.52
  text "10.00mil (0.254mm)" at 152.226,83.981 h1.52
  text "PTH" at 168.395,83.981 h1.52
  text "Round" at 174.977,83.981 h1.52
  text "Top Layer - Bottom Layer" at 184.506,83.981 h1.52
  text "31" at 143.793,80.823 h1.52
  text "40.00mil (1.016mm)" at 152.226,80.823 h1.52
  text "PTH" at 168.395,80.823 h1.52
  text "Round" at 174.977,80.823 h1.52
  text "Top Layer - Bottom Layer" at 184.506,80.823 h1.52
  text "52" at 143.793,77.665 h1.52
  text "40.16mil (1.020mm)" at 152.226,77.665 h1.52
  text "PTH" at 168.395,77.665 h1.52
  text "Round" at 174.977,77.665 h1.52
  text "Top Layer - Bottom Layer" at 184.506,77.665 h1.52
  text "5" at 143.793,74.508 h1.52
  text "47.24mil (1.200mm)" at 152.226,74.508 h1.52
  text "PTH" at 168.395,74.508 h1.52
  text "Round" at 174.977,74.508 h1.52
  text "Top Layer - Bottom Layer" at 184.506,74.508 h1.52
  text "5" at 143.793,71.35 h1.52
  text "49.21mil (1.250mm)" at 152.226,71.35 h1.52
  text "PTH" at 168.395,71.35 h1.52
  text "Round" at 174.977,71.35 h1.52
  text "Top Layer - Bottom Layer" at 184.506,71.35 h1.52
  text "6" at 143.793,68.192 h1.52
  text "51.18mil (1.300mm)" at 152.226,68.192 h1.52
  text "PTH" at 168.395,68.192 h1.52
  text "Round" at 174.977,68.192 h1.52
  text "Top Layer - Bottom Layer" at 184.506,68.192 h1.52
  text "408 Total" at 143.793,65.035 h1.52
  text ".Layer_Name" at 14.656,-21.806 h1.52
M17 Embedded Cavity:
  text ".Layer_Name" at 14.656,-21.806 h1.52
M18 Embedded Assembly:
  text ".Layer_Name" at 14.656,-21.806 h1.52
M19 Embedded Keepout:
  text ".Layer_Name" at 14.656,-21.806 h1.52

## Dimensions
0,-10.16 to 25.4,-10.16 on M2 Board Dimensions
0,0 to 0,63.094 on M2 Board Dimensions
0,0 to 82.804,0 on M2 Board Dimensions

## Text inside footprints (layer, text, board x,y; h text height)
Logo3: Bottom Overlay "For evaluation only; not FCC approved for resale." at 56.896,61.138 h1.52
ZZ1: M5 Assembly Top "Install label in silkscreened box after final wash.  Text shall be 8 pt font.  Text shall be per the Label Table in the PDF schematic." at 5.842,99.517 h1.02